# Altium PCB Electrode_PCB_v2.1.PcbDoc
Units mil, origin at the board's own origin, x right, y up, seen from the top; angles counter-clockwise.
Board outline 510.49 x 1258.83 mil, 2 copper layers (Top Layer, Bottom Layer), stack 34 mil thick; 34 components, 24 nets, 94 pads, 31 vias.
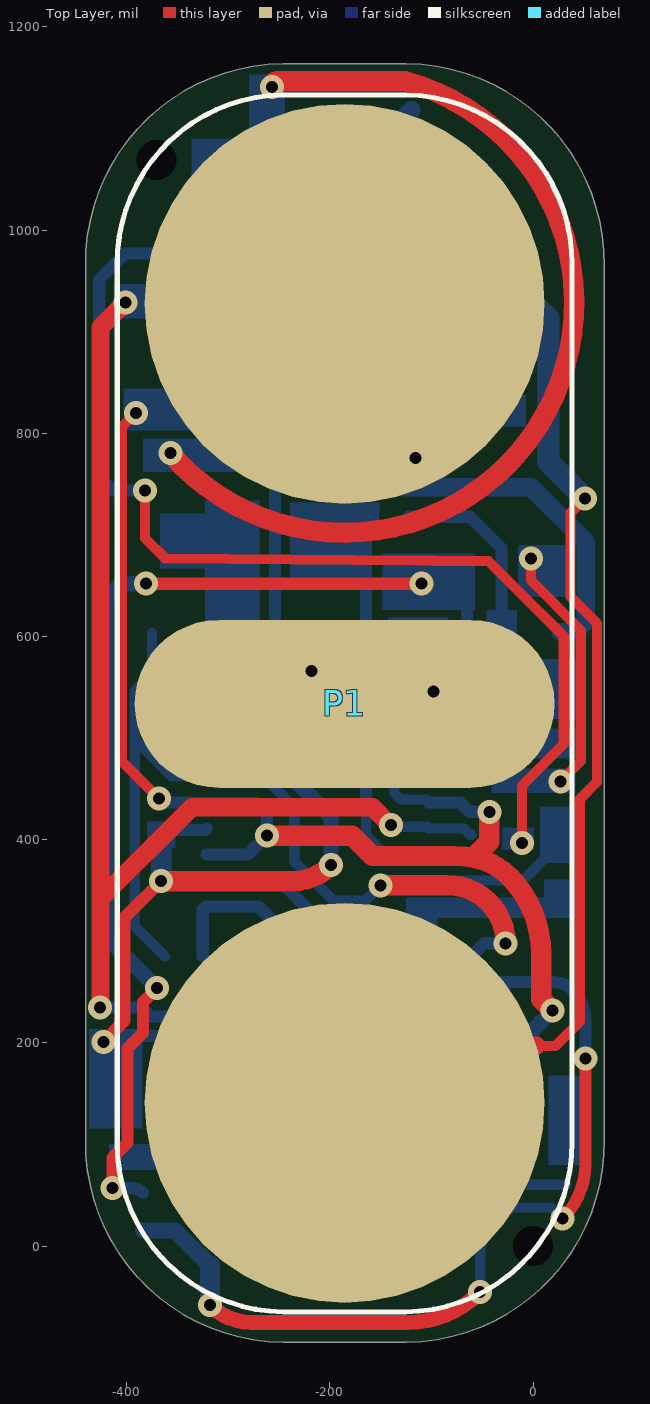
[diagram p0: Top Layer view]
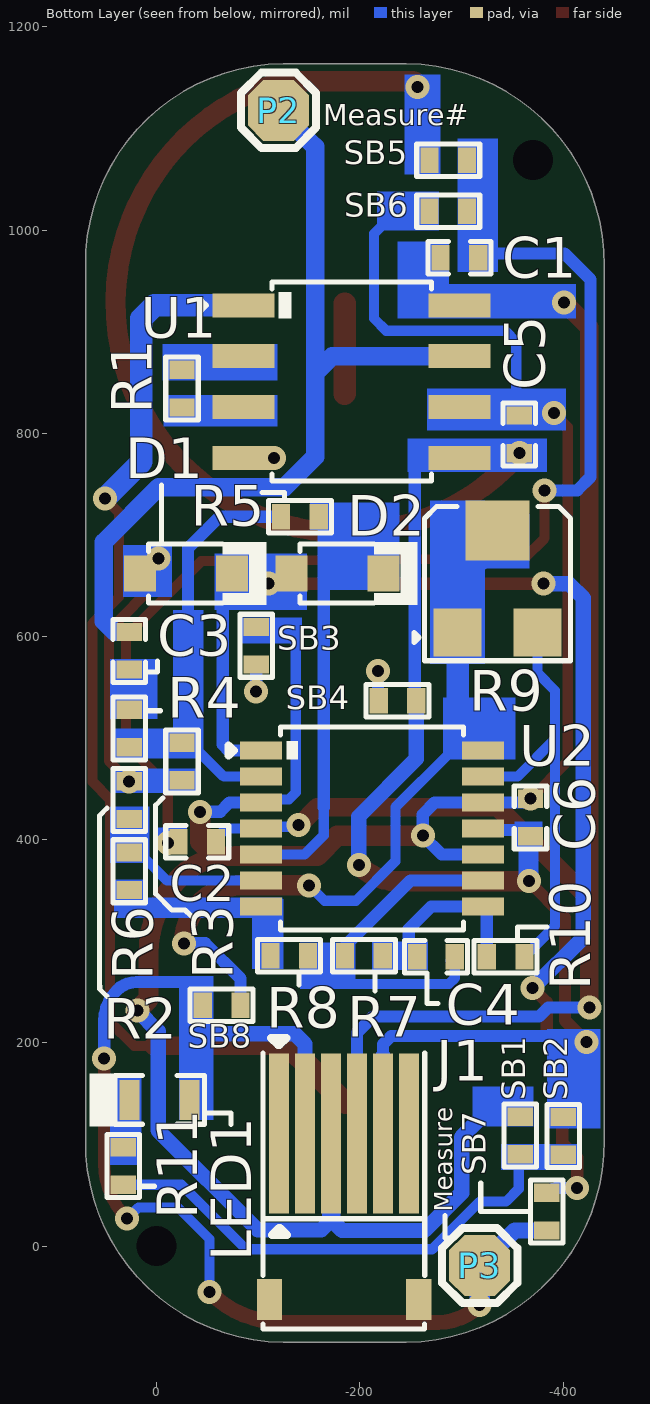
[diagram p1: Bottom Layer view, seen from below]
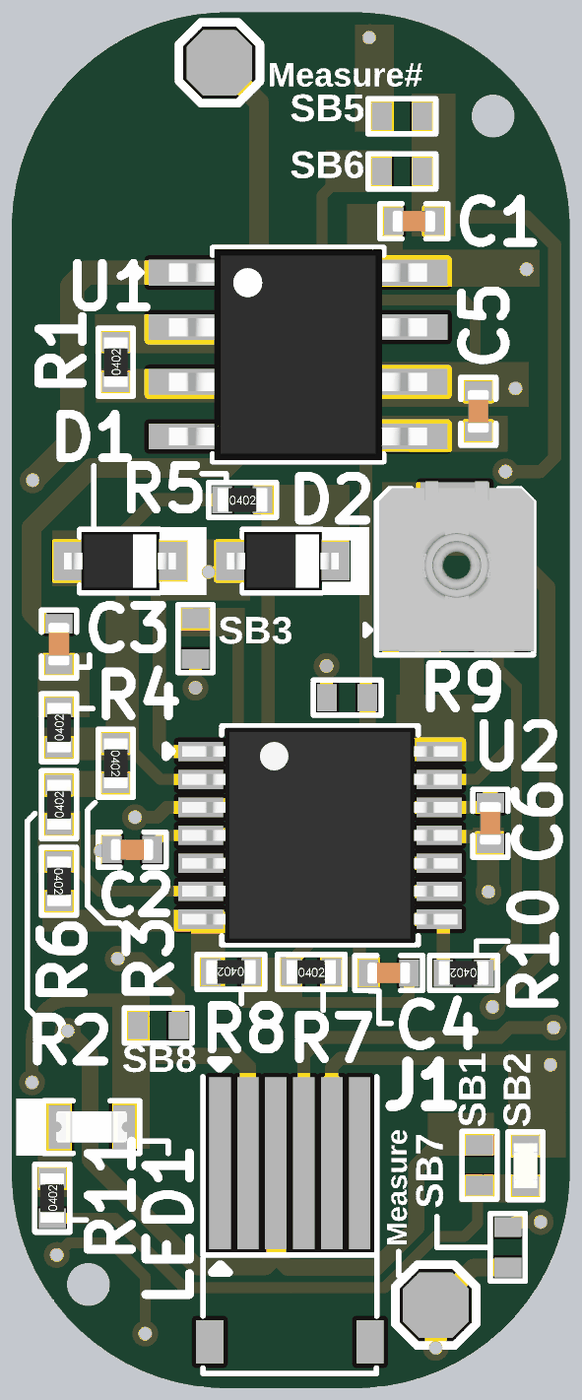
[diagram p2: 3D render of the assembled board from below, using the file's embedded part models]

## Layer stack, top to bottom
Top Solder: solder mask 3, Solder Resist, Dk 3.5
Top Layer: signal copper 9
Dielectric 1: dielectric 16, FR-4, Dk 4.8
Bottom Layer: signal copper 9
Bottom Solder: solder mask 3, Solder Resist, Dk 3.5

## Board outline
-440.49,104.27 ccw(c-243.65,102.06) -245.86,-94.78 -124.63,-94.78 ccw(c-126.84,102.06) 70,104.27 70,965 ccw(c-126.84,967.21) -124.63,1164.05 -245.86,1164.05 ccw(c-243.65,967.21) -440.49,965

## Design rules (kind name [scope] priority, off if disabled: settings)
Clearance [All] p1: gap=6 ignorepadtopadclearanceinfootprint=FALSE except(4: Arc-SMDPad Track-SMDPad SMDPad-SMDPad)
HoleSize [All] p1: absolutevalues=TRUE maxlimit=1000 minlimit=1 maxpercent=80.000 minpercent=20.000
HoleToHoleClearance [All] p1: gap=0 allowstackedmicrovias=TRUE
MinimumSolderMaskSliver [All] p1: minsoldermaskwidth=0
PolygonConnect [All] p1: connectstyle=Relief reliefconductorwidth=10 reliefentries=4 polygonreliefangle="90 Angle" airgapwidth=10
RoutingVias [All] p1: holewidth=11.81 width=23.62 viastyle="Through Hole" minholewidth=11.81 minwidth=23.62 maxholewidth=31.5 maxwidth=62.99
SilkToSilkClearance [All] p1: silktosilkclearance=0
SilkToSolderMaskClearance [IsPad] p1: minsilkscreentomaskgap=0 clearancetoexposedcopper=TRUE
SolderMaskExpansion [All] p1: expansion=4 istentingtop=FALSE
Width [All] p1: maxlimit=40 minlimit=10 preferedwidth=22
25 further rules are at their usual default settings.

## Components (designator, comment, footprint, x,y, rotation, side; value= is the part's Value field where it differs from the comment)
C1 "1uF" Cap-0402 -298,973 r180 bottom
C2 "0.1uF" CAP-0402 -40,398 r0 bottom
C3 "10nF" CAP-0402 27.02,586 r270 bottom locked
C4 "1uF" CAP-0402 -274.98,285 r180 bottom locked
C5 "1uF" Cap-0402 -357,799 r90 bottom
C6 "0.1uF" CAP-0402 -368,422 r90 bottom
D1 "1N4148WS" SOD-323 -29,662 r0 bottom locked
D2 "1N4148WS" SOD-323 -178,662 r0 bottom
J1 "For Electrode Board" "6 Pin Pads 0.65mm Pitch" -131.41,95 r180 bottom locked
LED1 "Orange" LED-0603 -2.98,144 r0 bottom locked
P1 "sEMG sensor" SEMG-SENSOR -185.49,534.27 r0 top locked
P2 "TEST POINT" TEST-POINT -120,1118 r180 bottom locked
P3 "TEST POINT" TEST-POINT -318,-19 r180 bottom
R1 "240R" RES-0402 -25,844 r90 bottom locked
R2 "150K" RES-0402 27.02,439 r90 bottom locked
R3 "150K" RES-0402 -25,477 r270 bottom locked
R4 "150K" RES-0402 27.02,509.5 r90 bottom locked
R5 "150K" RES-0402 -141,718 r180 bottom locked
R6 "150K" RES-0402 27.02,369 r270 bottom locked
R7 "80.6K" Res0402 -203.98,286 r180 bottom locked
R8 "80.6K" Res0402 -130.48,286 r0 bottom locked
R9 "TC33X-2-104E" TC33X-2-104E_ -296.26,604 r180 bottom locked
R10 "1K" RES-0402 -343.5,285 r0 bottom
R11 "1K" RES-0402 33,79 r90 bottom locked
SB1 "Solder Bridge 0402" "Solder Bridge 0402" -358,109 r270 bottom
SB2 "Solder Bridge 0402" "Solder Bridge 0402" -400.22,108.63 r270 bottom locked
SB3 "Solder Bridge 0402" "Solder Bridge 0402" -98,591 r90 bottom
SB4 "Solder Bridge 0402" "Solder Bridge 0402" -237,537 r180 bottom
SB5 "Solder Bridge 0402" "Solder Bridge 0402" -287,1069 r0 bottom
SB6 "Solder Bridge 0402" "Solder Bridge 0402" -287,1018.5 r0 bottom
SB7 "Solder Bridge 0402" "Solder Bridge 0402" -384,34 r270 bottom
SB8 "Solder Bridge 0402" "Solder Bridge 0402" -64,237 r0 bottom
U1 "AD8221ARZ-R7" SOIC-8 -191.98,851 r180 bottom locked
U2 "TL084CPWR" 14-TSSOP -211.98,411 r180 bottom locked

## Footprints (in the part's own frame and the unit in brackets; to place one, negate y for a bottom-side part, rotate by r counter-clockwise, add the part's x,y. Pads: shape width x height; smd on the part's side, far side on the other; paste and mask are expansions set on the pad)
"6 Pin Pads 0.65mm Pitch" [mm]
  rect 0.5x4 smd: 1(-0.279,0.406) 2(0.371,0.406) 3(1.021,0.406) 4(1.671,0.406) 5(2.321,0.406) 6(2.971,0.406)
  silkscreen extent -0.67,-2.13 3.37,2.79
14-TSSOP [mm]
  rect 1.05x0.45 smd: 1(-2.775,1.95) 2(-2.775,1.3) 3(-2.775,0.65) 4(-2.775,0) 5(-2.775,-0.65) 6(-2.775,-1.3) 7(-2.775,-1.95) 8(2.775,-1.95) 9(2.775,-1.3) 10(2.775,-0.65) 11(2.775,0) 12(2.775,0.65) 13(2.775,1.3) 14(2.775,1.95)
  silkscreen extent -3.58,-2.54 2.29,2.54, body extent -3.2,-2.5 3.2,2.5, height 1.2
Cap-0402 [mil]
  rect 18x25 smd mask+2.36: 1(-18.5,0) 2(18.5,0)
  silkscreen extent -31,-16 31,16, body extent -20,-10 20,10, height 19
CAP-0402 [mil]
  rect 18x25 smd mask+2.36: 1(-18.5,0) 2(18.5,0)
  silkscreen extent -31,-16 31,16, body extent -20,-10 20,10, height 19
LED-0603 [mm]
  rect 0.5x1 smd: 1(-0.75,0) 2(0.75,0)
  silkscreen extent -1.12,-0.66 1.75,0.66, body extent -0.82,-0.37 0.82,0.36, height 0.68
Res0402 [mil]
  rect 18x25 smd mask+4: 1(-18.5,0) 2(18.5,0)
  silkscreen extent -32,-17 32,16, body extent -23,-11 23,11, height 16
RES-0402 [mil]
  rect 18x25 smd mask+2.17: 1(-18.5,0) 2(18.5,0)
  silkscreen extent -32,-17 32,16, body extent -23,-11 23,11, height 16
SEMG-SENSOR [mm]
  round 10 smd: 1(0,9.987) 2(0,-9.987)
  oval 10.5x4.2 smd: 3(0,-0.013)
  silkscreen extent -5.68,-15.21 5.68,15.21
SOD-323 [mm]
  rect 0.8x0.9 smd mask+0.055: 1(-1.15,0) 2(1.15,0)
  silkscreen extent -2.01,-0.79 0.94,0.79, body extent -1.3,-0.67 1.3,0.67, height 1.1
SOIC-8 [mm]
  rect 1.55x0.6 smd: 1(-2.7,1.905) 2(-2.7,0.635) 3(-2.7,-0.635) 4(-2.7,-1.905) 5(2.7,-1.905) 6(2.7,-0.635) 7(2.7,0.635) 8(2.7,1.905)
  silkscreen extent -3.76,-2.49 1.99,2.49, body extent -3,-2.45 3,2.45, height 1.7
"Solder Bridge 0402" [mil]
  rect 18x25 smd mask+2.17: 1(-18.5,0) 2(18.5,0)
  silkscreen extent -32,-17 32,16
TC33X-2-104E_ [mm]
  rect 1.2x1.2 smd: 1(0,0) 3(2,0)
  rect 1.6x1.5 smd: 2(1,2.55)
  silkscreen extent -1.09,-0.71 2.83,3.15, body extent -0.76,-0.64 2.84,3.32, height 1.13
TEST-POINT [mil]
  oct 60x60 smd: 1(0,0)
  silkscreen extent -37,-37 37,37

## Part data
C1 C4 C5: library part CC0402KRX5R7BB105, "CAP CER 1UF 16V X5R 0402", Case Code (Imperial)=0402, Case Code (Metric)=1005, Dielectric=X5R, LCSC Part Number=C325464, Manufacturer=Yageo, Max Operating Temperature=85°C, Min Operating Temperature=-55°C, Supplier Part Number 1=311-1691-6-ND, Tolerance=10%, Voltage Rating=16V, Capacitance=1uF, Case/Package=0402, ComponentLink1Description=http://www.yageo.com/documents/recent/UPY-GPHC_X5R_4V-to-50V_12.pdf?src-supplier=Avnet+Europe, ComponentLink1URL=http://www.yageo.com/documents/recent/UPY-GPHC_X5R_4V-to-50V_12.pdf?src-supplier=Avnet+Europe, Composition=Ceramic, Depth=0.5mm, Halogen Free="Halogen Free", Height=0.5mm, Item Type=Capacitor, Lead Free="Lead Free", Length=1mm, Manufacturer Part Number=CC0402KRX5R7BB105, Mount="Surface Mount", Packaging="Tape and Reel", Pricing 1="1=0.36, 10=0.252, 100=0.1512, 500=0.1134, 1000=0.09576, 2500=0.09072, 5000=0.08568 (USD)", Radiation Hardening=No, Stock 1=1405667, Supplier 1=Digi-Key, Termination=SMD/SMT, Thickness=0.022inch, Voltage Rating (DC)=16V, Weight=2.3E-05oz, Width=0.02inch
C2 C6: library part GRM155R71H104ME14D, "CAP CER 0.1UF 50V X7R 0402", Capacitance=100nF, Case/Package=0402, LCSC Part Number=C182412, Manufacturer=Murata, Max Operating Temperature=125°C, Min Operating Temperature=-55°C, Tolerance=20%, Voltage Rating=50V, Category="Ceramic Capacitors", ComponentLink1Description=http://www.mouser.com/ds/2/281/c02e-2905.pdf?src-supplier=Mouser, ComponentLink1URL=http://www.mouser.com/ds/2/281/c02e-2905.pdf?src-supplier=Mouser, ComponentLink2Description=http://search.murata.co.jp/Ceramy/image/img/A01X/G101/ENG/GRM155R71H104ME14-01.pdf?src-supplier=Digi-Key, ComponentLink2URL=http://search.murata.co.jp/Ceramy/image/img/A01X/G101/ENG/GRM155R71H104ME14-01.pdf?src-supplier=Digi-Key, ComponentLink3Description=http://psearch.en.murata.com/capacitor/product/GRM155R71H104ME14%23.pdf?src-supplier=Avnet, ComponentLink3URL=http://psearch.en.murata.com/capacitor/product/GRM155R71H104ME14%23.pdf?src-supplier=Avnet, Item Type=Capacitor, Length=0.039inch, Manufacturer Part Number=GRM155R71H104ME14D, Mount="Surface Mount", Packaging="Cut Tape", Pricing 1="10000=0.00444, 20000=0.00420, 40000=0.00396, 60000=0.00372, 80000=0.00348, 100000=0.00324, 1000000=0.00300 (USD)", RoHS=Yes, RoHS Compliant=Yes, Stock 1=100000, Supplier 1=Avnet, Supplier Part Number 1=GRM155R71H104ME14D, Thickness=0.022inch, Width=0.02inch
C3: library part CC0402KRX7R9BB103, "CAP CER 10000PF 50V X7R 0402", Case Code (Imperial)=0402, Case Code (Metric)=1005, Dielectric=X7R, LCSC Part Number=C60133, Manufacturer=Yageo, Max Operating Temperature=125°C, Min Operating Temperature=-55°C, Package Quantity=1, Resistor Type=Ceramic, Tolerance=10%, Voltage=50V, Capacitance=10nF, Case/Package=0402, Category="Ceramic Capacitors", ComponentLink1Description=https://datasheet.ciiva.com/11788/0900766b8079c870-11788375.pdf?src-supplier=RSComponents, ComponentLink1URL=https://datasheet.ciiva.com/11788/0900766b8079c870-11788375.pdf?src-supplier=RSComponents, ComponentLink2Description=https://datasheet.ciiva.com/26862/getdatasheetpartid-138248-26862642.pdf?src-supplier=Verical, ComponentLink2URL=https://datasheet.ciiva.com/26862/getdatasheetpartid-138248-26862642.pdf?src-supplier=Verical, ComponentLink3Description=https://datasheet.ciiva.com/7978/1489800-7978093.pdf?src-supplier=Element14, ComponentLink3URL=https://datasheet.ciiva.com/7978/1489800-7978093.pdf?src-supplier=Element14, ComponentLink4Description=https://datasheet.ciiva.com/28450/1489800-28450377.pdf?src-supplier=Element14, ComponentLink4URL=https://datasheet.ciiva.com/28450/1489800-28450377.pdf?src-supplier=Element14, ComponentLink5Description=https://datasheet.ciiva.com/176/mlccorderingcode-176349.pdf?src-supplier=Digi-Key, ComponentLink5URL=https://datasheet.ciiva.com/176/mlccorderingcode-176349.pdf?src-supplier=Digi-Key, ComponentLink6Description=https://datasheet.ciiva.com/176/mlccorderingcode-176348.pdf?src-supplier=Digi-Key, ComponentLink6URL=https://datasheet.ciiva.com/176/mlccorderingcode-176348.pdf?src-supplier=Digi-Key, ComponentLink7Description=https://datasheet.ciiva.com/176/mlccorderingcode-176350.pdf?src-supplier=Digi-Key, ComponentLink7URL=https://datasheet.ciiva.com/176/mlccorderingcode-176350.pdf?src-supplier=Digi-Key, Depth=0.5mm, Halogen Free="Halogen Free", Height=0.5mm, Item Type=Capacitor, Lead Free="Lead Free", Length=1mm, Manufacturer Part Number=CC0402KRX7R9BB103, Mount="Surface Mount", Packaging="Tape and Reel", Pricing 1="10000=0.00178 (USD)", Radiation Hardening=No, Reach SVHC Compliant=Yes, RoHS=Yes, RoHS Compliant=Yes, Series=CC, Stock 1=995000, Supplier 1=Avnet, Supplier Part Number 1=CC0402KRX7R9BB103, Termination=SMD/SMT, Thickness=0.022inch, Voltage Rating=50V, Voltage Rating (DC)=50V, Width=0.02inch
D1 D2: "100V -55℃~+150℃@(Tj) 400mW Single 1.25V@150mA 4ns 1μA@75V 200mA SOD-323 Switching Diode ROHS", Manufacturer=YFW, ComponentLink1Description=LCSC, ComponentLink1URL=https://lcsc.com/product-detail/Switching-Diode_YFW-1N4148WS_C1884546.html, Manufacturer Part Number=1N4148WS
J1: library part "6 Pin Pads 0.65mm Pitch", "Ribbon wire Connection Pads 0.65mm Pitch"
LED1: library part 19-217/S2C-AQ1R1B/3T, "0603(H=0.4mm) λD=600.5~612.5nm VR=5V VF=1.7V~2.2V IF=25mA PD=60mW", LCSC Part Number=C146215, Manufacturer=Everlight, Supplier Part Number 1=1080-19-217/S2C-AQ1R1B/3TTR-ND, Category=LEDs, ComponentLink1Description=LCSC, ComponentLink1URL=https://www.lcsc.com/product-detail/Light-Emitting-Diodes-LED_Everlight-Elec-19-217-S2C-AQ1R1B-3T_C146215.html, Item Type=LED, Manufacturer Part Number=19-217/S2C-AQ1R1B/3T, RoHS=No, Supplier 1=Digi-Key
P1: library part "SEMG Sensor", "Sensor Connecting Pads"
P2 P3: "Test Point ON", Item Type="TEST POINT"
R1: library part RC0402FR-07240RL, "RES 240 OHM 1% 1/16W 0402", Case Code (Imperial)=0402, Case Code (Metric)=1005, Manufacturer=Yageo, Max Operating Temperature=155°C, Max Power Dissipation=63mW, Min Operating Temperature=-55°C, Package Quantity=1, Resistance Tolerance=1%, Resistor Type="Thick Film", Supplier Part Number 1=603-RC0402FR-07240RL, Temperature Coefficient=100ppm/°C, Voltage Rating=50V, Case/Package=0402, Category="Chip SMD Resistors", ComponentLink1Description=https://datasheet.ciiva.com/7849/1018594-7849915.pdf?src-supplier=Element14, ComponentLink1URL=https://datasheet.ciiva.com/7849/1018594-7849915.pdf?src-supplier=Element14, ComponentLink2Description=https://datasheet.ciiva.com/7849/1018594-7849916.pdf?src-supplier=Element14, ComponentLink2URL=https://datasheet.ciiva.com/7849/1018594-7849916.pdf?src-supplier=Element14, ComponentLink3Description=https://datasheet.ciiva.com/2519/pyu-r-int-thick-7-2519157.pdf?src-supplier=Digi-Key, ComponentLink3URL=https://datasheet.ciiva.com/2519/pyu-r-int-thick-7-2519157.pdf?src-supplier=Digi-Key, ComponentLink4Description=https://datasheet.ciiva.com/2519/pyu-r-int-thick-7-2519158.pdf?src-supplier=Digi-Key, ComponentLink4URL=https://datasheet.ciiva.com/2519/pyu-r-int-thick-7-2519158.pdf?src-supplier=Digi-Key, ComponentLink5Description=https://datasheet.ciiva.com/2519/pyu-r-int-thick-7-2519156.pdf?src-supplier=Digi-Key, ComponentLink5URL=https://datasheet.ciiva.com/2519/pyu-r-int-thick-7-2519156.pdf?src-supplier=Digi-Key, ComponentLink6Description=https://datasheet.ciiva.com/12669/pyu-rc0402-51-rohs-l-6-r-12669689.pdf?src-supplier=Mouser, ComponentLink6URL=https://datasheet.ciiva.com/12669/pyu-rc0402-51-rohs-l-6-r-12669689.pdf?src-supplier=Mouser, ComponentLink7Description=https://datasheet.ciiva.com/17419/pyu-rc0402-51-rohs-l-6-r-17419482.pdf?src-supplier=Future+Electronics, ComponentLink7URL=https://datasheet.ciiva.com/17419/pyu-rc0402-51-rohs-l-6-r-17419482.pdf?src-supplier=Future+Electronics, Construction=Rectangular, Depth=0.5mm, Features="Moisture Resistant", Height=0.016inch, Lead Free="Lead Free", Length=1mm, Manufacturer Part Number=RC0402FR-07240RL, Military Standard=Not, Number of Terminations=2, Packaging="Tape and Reel", Power Rating=63mW, Pricing 1="1=0.10000, 10=0.01200, 50=0.01200, 100=0.00500, 1000=0.00300, 10000=0.00100 (USD)", REACH SVHC=Unknown, Resistance=240R, RoHS=Yes, RoHS Compliant=Yes, Series=RC, Size Code=0402, Stock 1=1903202, Supplier 1=Mouser, Termination=SMD/SMT, Tolerance=1%, Voltage Rating (DC)=50V, Width=0.02inch
R2 R3 R4 R5 R6: library part RC0402JR-07150KL, "RES SMD 0402 150kOhm 5% Paper T/R", Case Code (Imperial)=0402, Case Code (Metric)=1005, LCSC Part Number=C137919, Manufacturer=Yageo, Max Operating Temperature=155°C, Max Power Dissipation=63mW, Min Operating Temperature=-55°C, Package Quantity=1, Resistance=150kR, Resistance Tolerance=5%, Resistor Type="Thick Film", Temperature Coefficient=100ppm/°C, Voltage Rating=50V, Case/Package=0402, Category="Chip SMD Resistors", ComponentLink1Description=https://datasheet.ciiva.com/7983/1018594-7983551.pdf?src-supplier=Element14, ComponentLink1URL=https://datasheet.ciiva.com/7983/1018594-7983551.pdf?src-supplier=Element14, ComponentLink2Description=https://datasheet.ciiva.com/2518/pyu-r-int-thick-7-2518929.pdf?src-supplier=Digi-Key, ComponentLink2URL=https://datasheet.ciiva.com/2518/pyu-r-int-thick-7-2518929.pdf?src-supplier=Digi-Key, ComponentLink3Description=https://datasheet.ciiva.com/2518/pyu-r-int-thick-7-2518930.pdf?src-supplier=Digi-Key, ComponentLink3URL=https://datasheet.ciiva.com/2518/pyu-r-int-thick-7-2518930.pdf?src-supplier=Digi-Key, ComponentLink4Description=https://datasheet.ciiva.com/2518/pyu-r-int-thick-7-2518928.pdf?src-supplier=Digi-Key, ComponentLink4URL=https://datasheet.ciiva.com/2518/pyu-r-int-thick-7-2518928.pdf?src-supplier=Digi-Key, ComponentLink5Description=https://datasheet.ciiva.com/7850/1018594-7850149.pdf?src-supplier=Element14, ComponentLink5URL=https://datasheet.ciiva.com/7850/1018594-7850149.pdf?src-supplier=Element14, ComponentLink6Description=https://datasheet.ciiva.com/17072/pyu-rc0402-51-rohs-l-6-r-17072379.pdf?src-supplier=Future+Electronics, ComponentLink6URL=https://datasheet.ciiva.com/17072/pyu-rc0402-51-rohs-l-6-r-17072379.pdf?src-supplier=Future+Electronics, ComponentLink7Description=https://datasheet.ciiva.com/15189/getdatasheetpartid-251830-15189543.pdf?src-supplier=Verical, ComponentLink7URL=https://datasheet.ciiva.com/15189/getdatasheetpartid-251830-15189543.pdf?src-supplier=Verical, Construction=Rectangular, Depth=0.5mm, Features="Moisture Resistant", Height=0.016inch, Item Type=Resistor, Lead Free="Lead Free", Length=1mm, Manufacturer Part Number=RC0402JR-07150KL, Military Standard=Not, Number of Terminations=2, Packaging="Tape and Reel", Power Rating=63mW, Pricing 1="10000=0.00100 (USD)", REACH SVHC="No SVHC", RoHS=Yes, RoHS Compliant=Yes, Series=RC, Size Code=0402, Stock 1=170000, Supplier 1="Arrow Electronics", Supplier Part Number 1=RC0402JR-07150KL, Termination=SMD/SMT, Tolerance=5%, Weight=2.3E-05oz, Width=0.02inch
R7 R8: library part RC-02W8062FT, "1/16W 50V ±1% ±200ppm/℃ -55℃~+155℃ 80.6kΩ 0402 Chip Resistor - Surface Mount ROHS", Manufacturer=FH, Manufacture Part Number=RC-02W8062FT
R9: "TRIMMER 100K OHM 0.1W J LEAD TOP", Color=Silver, LCSC Part Number=C719186, Manufacturer=Bourns, Max Operating Temperature=100°C, Max Power Dissipation=100mW, Min Operating Temperature=-40°C, Package Quantity=2500, Resistance=100kR, Resistance Tolerance=25%, Resistor Type=Carbon,Cermet, Temperature Coefficient=250ppm/°C, Voltage Rating (DC)=50V, Category="Variable Resistors and Potentiometers", ComponentLink1Description=https://datasheet.ciiva.com/11832/0900766b802749b3-11832506.pdf?src-supplier=RSComponents, ComponentLink1URL=https://datasheet.ciiva.com/11832/0900766b802749b3-11832506.pdf?src-supplier=RSComponents, ComponentLink2Description=https://datasheet.ciiva.com/8700/tc33-8700395.pdf?src-supplier=Avnet, ComponentLink2URL=https://datasheet.ciiva.com/8700/tc33-8700395.pdf?src-supplier=Avnet, ComponentLink3Description=https://datasheet.ciiva.com/2155/tc33-2155965.pdf?src-supplier=Digi-Key, ComponentLink3URL=https://datasheet.ciiva.com/2155/tc33-2155965.pdf?src-supplier=Digi-Key, ComponentLink4Description=https://datasheet.ciiva.com/7953/1818686-7953181.pdf?src-supplier=Element14, ComponentLink4URL=https://datasheet.ciiva.com/7953/1818686-7953181.pdf?src-supplier=Element14, ComponentLink5Description=https://datasheet.ciiva.com/16716/70155234-16716301.pdf?src-supplier=Allied+Electronics, ComponentLink5URL=https://datasheet.ciiva.com/16716/70155234-16716301.pdf?src-supplier=Allied+Electronics, ComponentLink6Description=https://datasheet.ciiva.com/2155/tc33-2155966.pdf?src-supplier=Digi-Key, ComponentLink6URL=https://datasheet.ciiva.com/2155/tc33-2155966.pdf?src-supplier=Digi-Key, ComponentLink7Description=https://datasheet.ciiva.com/7953/1818686-7953182.pdf?src-supplier=Element14, ComponentLink7URL=https://datasheet.ciiva.com/7953/1818686-7953182.pdf?src-supplier=Element14, ComponentLink8Description=https://datasheet.ciiva.com/2155/tc33-2155967.pdf?src-supplier=Digi-Key, ComponentLink8URL=https://datasheet.ciiva.com/2155/tc33-2155967.pdf?src-supplier=Digi-Key, Depth=3.8mm, Height=0.047inch, Item Type=Trimmer, Length=3mm, Manufacturer Part Number=TC33X-2-104E, Military Standard=Not, Mount="Surface Mount", Number of Turns=1, Packaging="Tape and Reel", Power Rating=100mW, Pricing 1="2500=0.15500, 5000=0.13130 (USD)", Radiation Hardening=No, REACH SVHC="No SVHC", RoHS=Yes, RoHS Compliant=Yes, Series=TC33, Stock 1=12500, Supplier 1="Arrow Electronics", Supplier Part Number 1=TC33X-2-104E, Termination="Foot Print", Tolerance=25%, Weight=29.4mg, Width=0.118inch
R10 R11: library part RC0402JR-071KL, "RES 1K OHM 5% 1/16W 0402", Case Code (Imperial)=0402, Case Code (Metric)=1005, LCSC Part Number=C105637, Manufacturer=Yageo, Max Operating Temperature=155°C, Max Power Dissipation=63mW, Min Operating Temperature=-55°C, Package Quantity=1, Power Rating=62.5mW, Resistance=1kR, Resistance Tolerance=5%, Resistor Type="Thick Film", Supplier Part Number 1=311-1.0KJRCT-ND, Temperature Coefficient=100ppm/°C, Voltage Rating=50V, Case/Package=0402, Category="Chip SMD Resistors", ComponentLink1Description=https://datasheet.ciiva.com/7983/1018594-7983558.pdf?src-supplier=Element14, ComponentLink1URL=https://datasheet.ciiva.com/7983/1018594-7983558.pdf?src-supplier=Element14, ComponentLink2Description=https://datasheet.ciiva.com/2452/pyu-r-int-thick-7-2452756.pdf?src-supplier=Digi-Key, ComponentLink2URL=https://datasheet.ciiva.com/2452/pyu-r-int-thick-7-2452756.pdf?src-supplier=Digi-Key, ComponentLink3Description=https://datasheet.ciiva.com/2452/pyu-r-int-thick-7-2452757.pdf?src-supplier=Digi-Key, ComponentLink3URL=https://datasheet.ciiva.com/2452/pyu-r-int-thick-7-2452757.pdf?src-supplier=Digi-Key, ComponentLink4Description=https://datasheet.ciiva.com/2452/pyu-r-int-thick-7-2452755.pdf?src-supplier=Digi-Key, ComponentLink4URL=https://datasheet.ciiva.com/2452/pyu-r-int-thick-7-2452755.pdf?src-supplier=Digi-Key, ComponentLink5Description=https://datasheet.ciiva.com/7850/1018594-7850170.pdf?src-supplier=Element14, ComponentLink5URL=https://datasheet.ciiva.com/7850/1018594-7850170.pdf?src-supplier=Element14, ComponentLink6Description=https://datasheet.ciiva.com/7850/1018594-7850171.pdf?src-supplier=Element14, ComponentLink6URL=https://datasheet.ciiva.com/7850/1018594-7850171.pdf?src-supplier=Element14, ComponentLink7Description=https://datasheet.ciiva.com/17081/pyu-rc0402-51-rohs-l-6-r-17081438.pdf?src-supplier=Future+Electronics, ComponentLink7URL=https://datasheet.ciiva.com/17081/pyu-rc0402-51-rohs-l-6-r-17081438.pdf?src-supplier=Future+Electronics, Construction=Rectangular, Depth=0.5mm, Features="Moisture Resistant", Height=0.016inch, Item Type=Resistor, Lead Free="Lead Free", Length=0.039inch, Manufacturer Part Number=RC0402JR-071KL, Military Standard=Not, Number of Terminations=2, Packaging="Tape and Reel", Pricing 1="1=0.10000, 10=0.01300, 100=0.00540, 1000=0.00244, 2500=0.00212, 5000=0.00175 (USD)", REACH SVHC="No SVHC", RoHS=Yes, RoHS Compliant=Yes, Series=RC, Size Code=0402, Stock 1=452315, Supplier 1=Digi-Key, Termination=SMD/SMT, Tolerance=5%, Width=0.02inch
SB1 SB2 SB3 SB4 SB5 SB6 SB7 SB8: "Solder Bridge ON"
U1: "IC OPAMP INSTR 825KHZ 8SOIC", Case/Package=SOIC, Input Bias Current=1.5nA, Input Offset Voltage (Vos)=60uV, Input Resistance=100GR, LCSC Part Number=C13342, Manufacturer="Analog Devices", Max Dual Supply Voltage=18V, Max Operating Temperature=85°C, Max Power Dissipation=200mW, Min Dual Supply Voltage=2.3V, Min Operating Temperature=-40°C, Nominal Supply Current=1mA, Operating Supply Voltage=36V, Output Current per Channel=18mA, Package Quantity=1000, Power Supply Rejection Ratio (PSRR)=130dB, Quiescent Current=900uA, Supplier Part Number 1=584-AD8221ARZ-R7, Voltage Gain=60dB, -3db Bandwidth=825kHz, Bandwidth=562kHz, Category="Amplifiers - Op Amps, Buffer, Instrumentation", Common Mode Rejection Ratio=80dB, ComponentLink1Description=https://datasheet.ciiva.com/15128/getdatasheetpartid-313520-15128733.pdf?src-supplier=Verical, ComponentLink1URL=https://datasheet.ciiva.com/15128/getdatasheetpartid-313520-15128733.pdf?src-supplier=Verical, ComponentLink2Description=https://datasheet.ciiva.com/2975/ad8221-2975658.pdf?src-supplier=Avnet, ComponentLink2URL=https://datasheet.ciiva.com/2975/ad8221-2975658.pdf?src-supplier=Avnet, ComponentLink3Description=https://datasheet.ciiva.com/2975/ad8221-2975980.pdf?src-supplier=Avnet, ComponentLink3URL=https://datasheet.ciiva.com/2975/ad8221-2975980.pdf?src-supplier=Avnet, ComponentLink4Description=https://datasheet.ciiva.com/6628/ad8221-6628618.pdf?src-supplier=Digi-Key, ComponentLink4URL=https://datasheet.ciiva.com/6628/ad8221-6628618.pdf?src-supplier=Digi-Key, ComponentLink5Description=https://datasheet.ciiva.com/6628/ad8221-6628619.pdf?src-supplier=Digi-Key, ComponentLink5URL=https://datasheet.ciiva.com/6628/ad8221-6628619.pdf?src-supplier=Digi-Key, ComponentLink6Description=https://datasheet.ciiva.com/6628/ad8221-6628617.pdf?src-supplier=Digi-Key, ComponentLink6URL=https://datasheet.ciiva.com/6628/ad8221-6628617.pdf?src-supplier=Digi-Key, ComponentLink7Description=https://datasheet.ciiva.com/48709/001249009-da-01-en-ic-amp-inst-prec-ad8221arz-r7-soic-8-adi-48709526.pdf?src-supplier=Conrad, ComponentLink7URL=https://datasheet.ciiva.com/48709/001249009-da-01-en-ic-amp-inst-prec-ad8221arz-r7-soic-8-adi-48709526.pdf?src-supplier=Conrad, Contact Plating=Tin,Matte, Item Type=IC, Lead Free="Contains Lead", Manufacturer Part Number=AD8221ARZ-R7, Number of Channels=1, Number of Circuits=1, Number of Elements=1, Number of Pins=8, Operating Supply Current=1mA, Packaging="Tape and Reel", Power Dissipation=200mW, Pricing 1="1=7.37000, 10=6.66000, 25=6.35000, 50=6.35000, 100=5.51000, 250=5.27000, 500=4.80000, 1000=4.37000, 10000=4.37000 (USD)", Radiation Hardening=No, RoHS=Yes, RoHS Compliant=Yes, Series=-, Slew Rate=2.5V/µs, Supplier 1=Mouser, Supply Current=1mA
U2: "IC OPAMP JFET 4 CIRCUIT 14TSSOP", Case/Package=TSSOP, Input Bias Current=400pA, Input Offset Voltage (Vos)=15mV, Manufacturer="Texas Instruments", Max Dual Supply Voltage=18V, Max Operating Temperature=125°C, Max Power Dissipation=680mW, Min Dual Supply Voltage=3.5V, Min Operating Temperature=-40°C, Min Supply Voltage=7V, Nominal Supply Current=11.2mA, Operating Supply Current=1.4mA, Package Quantity=1, Quiescent Current=2.8A, Supplier Part Number 1=595-TL084CPWR, Voltage Gain=106.02dB, Bandwidth=3MHz, Category="Amplifiers - Op Amps, Buffer, Instrumentation", Common Mode Rejection Ratio=70dB, ComponentLink1Description=https://datasheet.ciiva.com/34301/1064719-34301936.pdf?src-supplier=Jameco, ComponentLink1URL=https://datasheet.ciiva.com/34301/1064719-34301936.pdf?src-supplier=Jameco, ComponentLink2Description=https://datasheet.ciiva.com/1795/tl081a-1795644.pdf?src-supplier=Digi-Key, ComponentLink2URL=https://datasheet.ciiva.com/1795/tl081a-1795644.pdf?src-supplier=Digi-Key, ComponentLink3Description=https://datasheet.ciiva.com/1795/tl081a-1795643.pdf?src-supplier=Digi-Key, ComponentLink3URL=https://datasheet.ciiva.com/1795/tl081a-1795643.pdf?src-supplier=Digi-Key, ComponentLink4Description=https://datasheet.ciiva.com/1795/tl081a-1795645.pdf?src-supplier=Digi-Key, ComponentLink4URL=https://datasheet.ciiva.com/1795/tl081a-1795645.pdf?src-supplier=Digi-Key, ComponentLink5Description=https://datasheet.ciiva.com/14459/tl082-14459749.pdf?src-supplier=Avnet, ComponentLink5URL=https://datasheet.ciiva.com/14459/tl082-14459749.pdf?src-supplier=Avnet, ComponentLink6Description=https://datasheet.ciiva.com/48707/001072249-da-01-en-ic-opamp-jfet-3mh-tl084cpwr-tssop-14-tid-48707867.pdf?src-supplier=Conrad, ComponentLink6URL=https://datasheet.ciiva.com/48707/001072249-da-01-en-ic-opamp-jfet-3mh-tl084cpwr-tssop-14-tid-48707867.pdf?src-supplier=Conrad, Contact Plating=Gold, Gain Bandwidth Product=3MHz, Lead Free="Lead Free", Manufacturer Part Number=TL084CPWR, Max I/O Voltage=15mV, Max Supply Voltage=18V, Nominal Gain Bandwidth Product=3MHz, Number of Amplifiers=4, Number of Channels=4, Number of Circuits=4, Number of Elements=4, Number of Pins=14, Packaging="Tape and Reel", Pricing 1="1=0.64000, 10=0.54500, 50=0.54500, 100=0.37800, 500=0.32000, 1000=0.24700, 2000=0.22500, 10000=0.22500 (USD)", Radiation Hardening=No, REACH SVHC="No SVHC", RoHS=Yes, RoHS Compliant=Yes, Slew Rate=13V/µs, Stock 1=3, Supplier 1=Mouser, Unity Gain Bandwidth Product=3MHz

## Free pads (board coordinates)
  round 0 hole 39.37 unplated: MH1(-370.49,1069.27) MH2(0,0)
  rect 25x40 smd far side: ""(-257.89,-52.5) ""(-111.09,-52.5)

## Via types
v1: diameter 23.62, hole 11.81, Top Layer to Bottom Layer, tented both sides, 31 vias

## Nets (pads, with @x,y where several pads share a name; then routed paths per layer and width w, separated by ;. In a path a pad name is that pad's centre, name@x,y a point inside that pad or via, vN(x,y) a via of type N, cw(c..) or ccw(c..) an arc to the next point about the centre after c; other vN are vias at no path point)
#rg: R1.2 U1.2
*rg: R1.1 U1.3
-VCC_3V3: C5.1 C6.1 J1.5 SB2.1 SB4.2 SB5.2 U1.5 U2.11 | length 2237
  Top Layer w12: v1(-423,201) -402,222 -402,323.6 v1(-366.3,359.3)
  Top Layer w20: v1(-366.3,359.3) -236.89,359.3 ccw(c-236.89,412.91) v1(-198.98,375) ; v1(-357,780.5) ccw(c-185.84,928.53) -125.5,1146.62 -251.38,1146.62 ccw(c-251.38,1141) v1(-257,1141)
  Bottom Layer w10: -410.61,161.5 -410.61,170.61 -389.22,192 ; C6.1 -366,403.5 C6.1@-364.5,403.5
  Bottom Layer w12: v1@-420,207 -231,207 -222.77,198.77 J1.5@-222.77,184.73 ; C6.1@-366,405 -361.24,409.76 -322.48,409.76 U2.11 ; SB4.2@-253.98,542 -253.98,768
  Bottom Layer w15: SB4.2 -255.5,479.5 -198.98,422.98 v1(-198.98,375)
  Bottom Layer w18: J1.5 J1.5@-222.77,184.73
  Bottom Layer w20: -406.22,144.63 -400.22,138.63 ; v1@-366,359.6 -366,403.5 C6.1@-366,405
  Bottom Layer w22: v1(-423,201) v1@-421,203 ; -258,1083 -257.31,1083.69 ; v1@-257.31,1140.69 v1(-257,1141)
  Bottom Layer w25: -257.31,1083.69 v1@-257.31,1140.69
END: P1.1 U1.4 | length 118.9
  Top Layer w22: P1.1@-185.25,927.83 -185.25,839.27 P1.1@-184.98,839
  Bottom Layer w22: v1(-115.67,776) U1.4
GND: R11.1 SB1.2 SB2.2 | length 472.9
  Bottom Layer w10: SB1.2@-356.5,89 -356.5,56.5 -344,44 -318.16,44 -271.16,-3 -88,-3 -24.5,60.5 R11.1
IN2N: R2.1 R6.1 U2.6 | length 141.2
  Bottom Layer w10: U2.6 -10.18,359.82 12,382 17.5,387.5 R6.1
IN2P: D2.1 R5.2 U2.5 | length 397.8
  Bottom Layer w10: D2.1@-219.17,664 -211,655.83 D2.1@-211,659.92 ; -164.5,432 -164.5,404.52 -145.39,385.41 U2.5 U2.5@-101.74,385.41
  Bottom Layer w12: -164.5,432 R5.2@-164.5,716
Measure: J1.2 LED1.1 P3.1 SB7.2 SB8.2 | length 1046.2
  Top Layer w12: v1(29,27) ccw(c-25.64,81.64) 51.63,81.64 v1(51.63,184.9)
  Top Layer w15: v1(-318,-58) ccw(c-276.96,-16.96) -276.96,-75 -123.42,-75 ccw(c-123.42,25) -52.71,-45.71 v1(-52,-45)
  Bottom Layer w10: v1(-52,-45) -52,7 -21,38 18,38 v1(29,27) ; -45.5,211.5 SB8.2
  Bottom Layer w12: SB8.2 -45.5,251.55 cw(c-33.55,251.55) -42,260 19.69,260 cw(c19.69,232.69) 39,252 cw(c8.5,221.5) 51.63,221.5 v1(51.63,184.9)
  Bottom Layer w15: J1.2@-146,183 -146,199 -136,209 -48,209 -45.5,211.5 -39,218
  Bottom Layer w16: SB7.2 -352.5,15.5 P3.1
  Bottom Layer w20: v1(-318,-58) -318,-23.14 P3.1
Measure#: C3.1 P2.1 U1.7 | length 849.7
  Bottom Layer w18: U1.7 -173,876 -160,863 ; P2.1 -156,1082 -156,863 -156,777 -126,747 -2,747 52,693 52,615.04 41.46,604.5 C3.1
Measure*: R9.1 R9.2 SB8.1 U2.14 | length 692.7
  Top Layer w20: v1(-150,355.19) -86.49,355.19 cw(c-83.99,298.13) v1(-26.87,298.13)
  Bottom Layer w10: R9.2@-360.35,685 -336,685 -322,671 ; -318.98,509.5 -296.26,532.22 ; -312.98,654 -312.98,620.72 R9.1 ; -288,485 -235,432 -235,378.76 -196.24,340 -165.19,340 v1(-150,355.19)
  Bottom Layer w12: SB8.1 -82.5,263.5 -47.87,298.13 v1(-26.87,298.13)
  Bottom Layer w22: -296.26,532.22 R9.1
MID: P1.2 U1.1 | length 1101.3
  Top Layer w10: 3.19,197.19 22.19,197.19 46,221 46,440 63,457 63,613 37,639 37,722 v1(51,736)
  Top Layer w18: P1.2@-139.56,187 -129.37,197.19 3.19,197.19
  Top Layer w22: P1.2 P1.2@-139.56,187
  Bottom Layer w22: U1.1 2.11,926 15,913.11 15,772 v1(51,736)
NetC1_2: C1.2 C2.2 SB5.1 SB6.1 | length 1125.3
  Top Layer w10: v1(-381.87,743.91) -381.87,696.87 -361.96,676.96 -114.24,674.81 -114.16,674.81 -101.97,674.81 -99.02,674.68 -43.83,674.2 -18,648.37 30.2,600.17 30.2,494.2 -11,453 v1(-11,397)
  Bottom Layer w12: v1(-381.87,743.91) -413.91,743.91 -427,757 -427,951.38 -401.38,977 C1.2@-317,977
  Bottom Layer w25: C1.2@-317,977 -317,1018.5
NetC3_2: C3.2 R4.2
NetC4_2: C4.2 R7.1 R8.1 U2.9 | length 353.4
  Bottom Layer w10: C4.2@-289.48,281 C4.2 -293.48,263.86 -287.62,258 -178.98,258 ; R7.1@-188.98,289.5 R7.1 R7.1@-185.48,295.48 ; R7.1@-181.98,293 -174.98,286 R8.1@-152.98,286
  Bottom Layer w12: U2.9@-322.22,359.82 -249.82,359.82 R7.1@-185.48,295.48
NetD1_2: D1.2 R2.2 R3.2 | length 273.7
  Top Layer w10: v1(-2,677) -2,655.37 22.08,631.29 22.08,630.92 47,606 47,477.48 v1(27.02,457.5)
  Bottom Layer w10: v1(-2,677) 0.28,674.72 5.53,674.72 16.28,663.97 D1.2
NetLED1_2: LED1.2 R11.2
NetP1_3: P1.3 SB3.1 SB4.1 | length 53
  Bottom Layer w12: SB4.1@-218,539.5 v1(-218,566) ; v1(-98,546) SB3.1
NetR3_1: R3.1 R4.1 R5.1 U2.2 | length 366.6
  Bottom Layer w10: U2.2 U2.2@-101.74,462.18 ; U2.2@-101.65,462.09 U2.2@-101.74,462.18 ; R3.1@-26.92,501.44 -66.18,462.18 U2.2@-101.74,462.18
  Bottom Layer w12: R5.1 -61.98,718 -30.98,687 -30.98,517
NetR9_3: R9.3 R10.1 U2.13 | length 423.5
  Bottom Layer w10: R9.3 -375,563.98 -391.98,547 -391.98,498.98 ; R10.1 -383,306 -391.98,314.98 -391.98,498.98 ; U2.13@-322.22,462.18 -355.18,462.18 -391.98,498.98
OUT1: D1.1 D2.2 SB7.1 U2.1 | length 1189.4
  Top Layer w12: v1(-414,57.19) -414,87 -399.19,101.81 -399.19,194.81 -384,210 -384,240 v1(-370,254) ; v1(-381,652) v1(-110,652) v1@-109.76,652
  Bottom Layer w10: D1.1 D1.1@-65,652.72
  Bottom Layer w12: v1(-414,57.19) -395.32,57.19 cw(c-395.32,41.18) SB7.1@-384.02,52.52 ; v1@-113,649 -110,649 v1@-110,642 ; U2.1 -70.86,487.77 -65,493.63 D1.1@-65,652.72
  Bottom Layer w15: v1(-381,652) -406,652 -420,638 -420,304 v1(-370,254)
RECT: R6.2 R8.2 U2.7 | length 53.8
  Bottom Layer w10: R8.2 -111.98,328 -105.75,334.23 U2.7
SMOOTH: C4.1 R7.2 R10.2 U2.8 | length 152.7
  Bottom Layer w10: U2.8@-322.33,334.11 U2.8@-322.22,334.23
  Bottom Layer w12: R10.2 -325,331.44 U2.8@-322.33,334.11 ; U2.8@-322.22,334.23 U2.8 -270.23,334.23 -248.21,312.21 C4.1@-248.21,293
VCC_3V3: C1.1 C2.1 J1.4 U1.8 U2.4 | length 1458.4
  Top Layer w18: v1(-426,235) -425.68,235.32 -425.68,342.07 ; v1(-401.14,929.03) -425.68,904.49 -425.68,342.07 ; v1(-139.62,414.62) -140.6,414.62 -157.98,432 -335.76,432 -425.68,342.07
  Bottom Layer w10: v1(-401.14,929.03) v1@-399,929 ; v1(-139.62,414.62) -137.81,412.81 -104.54,412.81 U2.4 -68,411 -62,405 C2.1@-60.5,405
  Bottom Layer w12: v1(-426,235) -385.5,235 -376.5,226 -213,226 -197.18,210.18 J1.4
VREF_GND: C5.2 C6.2 J1.3 SB1.1 SB3.2 SB6.2 U1.6 U2.3 U2.10 U2.12 | length 2455.2
  Top Layer w10: v1(-391,820) -392.68,818.32 -404.68,806.32 -404.68,477.18 v1(-368,440.5)
  Top Layer w20: v1(-262,404) -261.81,403.81 -177.81,403.81 -158,384 -80.04,384 ; -77.84,384 cw(c-77.84,278.16) -57.28,381.98 cw(c-70.1,317.27) -23.45,363.92 cw(c-99.36,288) 8,288 8,243 v1(19,232) ; -56.86,384.14 -42.98,398.02 -42.98,427.28 v1(-42.67,427.59)
  Bottom Layer w10: C5.2@-358.48,809 -353.98,813.5 C5.2@-353.98,817.5 ; C5.2 -357,820.56 C5.2@-357,821.79 ; C5.2@-353.98,821.79 -353.98,823.5 -353.98,890 -342.98,901 -226,901 -214,913 -214,996.5 -236.25,1018.75 -247.5,1018.75 ; U2.3@-101.74,436.59 -104.96,439.81 -130.25,439.81 -137,446.56 -137,599.64 -131.14,605.5 -102,605.5 SB3.2
  Bottom Layer w12: v1(-368,440.5) -364.5,440.5 -360.59,436.59 U2.12 -273.59,436.59 -262,425 v1(-262,404) -280.59,385.41 U2.10 ; U2.3 -101.74,436.59 -71.59,436.59 -62.59,427.59 v1(-42.67,427.59)
  Bottom Layer w15: -343,139 -332,139 -300.28,107.28 -300.28,52.28 -263.5,15.5 -182.5,15.5 -172,26 -162,16 -99.5,16 -1.5,114 -1.5,211.5 v1(19,232)
  Bottom Layer w18: -172,26 J1.3@-172,110.59
  Bottom Layer w20: v1(-391,820) -390.44,820.56 -357,820.56 -356.92,820.56 -353.98,823.5 U1.6@-325,823.5
pads on no net: J1.1 J1.6

## Other copper
Bottom Layer:
  rectangle net #rg: -118.98,852 -6,888
  rectangle net NetC1_2: -30,390 1,412
  region net -VCC_3V3: -244,1055 -244,1153 -279.63,1153 -279.63,1055
  rectangle net VREF_GND: -143,593 -83,619
  rectangle net VREF_GND: -371.02,118 -311,157
  rectangle net RECT: -124.89,273 -93.89,341.61
  rectangle net Measure: -56,124 -22,266
  rectangle net NetC1_2: -336,959 -296,1090
  rectangle net NetD1_2: -41,446 42,470
  rectangle net -VCC_3V3: -384,762 -247,795
  rectangle net -VCC_3V3: -380,392 -352,418
  rectangle net Measure*: -353,479 -282,540
  rectangle net VREF_GND: -278,999.5 -217,1038
  rectangle net -VCC_3V3: -437,116 -384.22,214
  rectangle net VREF_GND: -403,803 -266,844
  rectangle net Measure*: -323,573 -269,734
  rectangle net VCC_3V3: -413,913 -237,947
  rectangle net NetD1_2: -15,639 33,690
  rectangle net OUT1: -148,626 -57,682
  rectangle net IN2P: -239,705 -151,732
  rectangle net NetR3_1: -45.98,480 43.02,509.5
  rectangle net SMOOTH: -266.98,272 -211.98,300
  rectangle net NetC4_2: -195.98,253 -141,299
  rectangle net NetR3_1: -45.98,480 -15.98,626
  rectangle net RECT: -124,323 42,343
  region net VCC_3V3: -237,931 -237,989 -288,989 -288,931
  rectangle net NetC3_2: -0.98,519 46.02,539
  rectangle net GND: -417.22,75 -339,100.63
  rectangle net NetLED1_2: 15.02,80 46.02,168
  rectangle net IN2N: 7,377 46.02,433
  rectangle net NetC3_2: -0.98,519 46.02,578
  rectangle net *rg: -118.98,807 -7,838
  rectangle net RECT: 11,323 42,361
  rectangle net Measure*: -367,667 -304,721
  rectangle net IN2P: -239,646 -159,732

## Silkscreen, mask and mechanical layers (free items; w line width, h text height)
Bottom Overlay:
  lines w5: -384,314 -355,314 -355,302 ; -367,34 -319,34 -319,62 ; -291,8 -284,8 -284,30 ; -277,239 -266,239 -266,268.53 -253.98,269 ; -266,269 -263.98,269 ; -263.94,-28.85 -263.94,33 ; -263.69,-76.5 -263.69,-81.5 -104.83,-81.5 -104.83,-76.5 ; -215,251 -215,268 ; -140,257 -140,269 ; -126,735 -126,742 -104,742 ; -104.83,-28.75 -104.83,27 ; -73,120 -73,131 -47,131 ; -34,325 -28,331 -14.98,331 0.93,346.91 0.93,434.07 -6.07,441.07 ; -5,692 -5,749 ; -4,527 11,527 ; -1,576 -1,565 11.02,565 ; 2,59 14,59 ; 49,246 56,253 56.02,261 56.02,424 49.02,431
  text "Measure#" at -164,1096.39 h35
  text "Measure" at -297,34 h30 r270
Board Outline:
  lines w5: -272.49,-92.67 -272.26,-92.44
  lines w10: -440.49,104.27 ccw(c-243.65,102.06) -245.86,-94.78 -124.63,-94.78 ccw(c-126.84,102.06) 70,104.27 70,965 ccw(c-126.84,967.21) -124.63,1164.05 -245.86,1164.05 ccw(c-243.65,967.21) -440.49,965 ; -440.49,104.27 -440.49,965 ; -440.49,104.27 -440.49,965
Fabrication:
  drawing of 191 lines, arcs and shapes, not listed
  text "Layer" at -1884.42,2686 h60
  text "Name" at -1474.51,2686 h60
  text "Material" at -544.77,2686 h60
  text "Thickness" at 315,2686 h60
  text "Constant" at 964.84,2686 h60
  text "Board Layer Stack" at 1534.7,2686 h60
  text "Top Overlay" at -1474.51,2566 h60
  text "Top Solder" at -1474.51,2446 h60
  text "Solder Resist" at -544.77,2446 h60
  text "0.076mm" at 315,2446 h60
  text "3.5" at 964.84,2446 h60
  text "1" at -1884.42,2326 h60
  text "Top Layer" at -1474.51,2326 h60
  text "0.229mm" at 315,2326 h60
  text "Dielectric 1" at -1474.51,2206 h60
  text "FR-4" at -544.77,2206 h60
  text "0.406mm" at 315,2206 h60
  text "4.8" at 964.84,2206 h60
  text "2" at -1884.42,2086 h60
  text "Bottom Layer" at -1474.51,2086 h60
  text "0.229mm" at 315,2086 h60
  text "Bottom Solder" at -1474.51,1966 h60
  text "Solder Resist" at -544.77,1966 h60
  text "0.076mm" at 315,1966 h60
  text "3.5" at 964.84,1966 h60
  text "Bottom Overlay" at -1474.51,1846 h60
  text "Total board thickness:" at -1884.42,1726 h60
  text "1.016mm" at 315,1726 h60
Drill Drawing:
  lines w10: -3542.71,3025.5 -3476.04,3025.5 -3476.04,3092.17 -3542.71,3092.17 -3542.71,3025.5 ; -3542.71,3192.17 -3526.04,3192.17 -3509.38,3175.5 -3492.71,3192.17 -3476.04,3192.17 -3492.71,3208.83 -3476.04,3225.5 -3492.71,3225.5 -3509.38,3242.17 -3526.04,3225.5 -3542.71,3225.5 -3526.04,3208.83 -3542.71,3192.17
  lines w15: -3602.5,2980.5 9191.93,2980.5 ; -3602.5,3280.5 9191.93,3280.5 ; -3051.62,2830.5 -3051.62,3430.5 ; -2511.76,2830.5 -2511.76,3430.5 ; -1422.08,2830.5 -1422.08,3430.5 ; -916.2,2830.5 -916.2,3430.5 ; -182.4,2830.5 -182.4,3430.5 ; 1317.15,2830.5 1317.15,3430.5 ; 1907,2830.5 1907,3430.5 ; 2652.79,2830.5 2652.79,3430.5 ; 3402.59,2830.5 3402.59,3430.5 ; 4256.35,2830.5 4256.35,3430.5 ; 5589.96,2830.5 5589.96,3430.5 ; 6923.57,2830.5 6923.57,3430.5 ; 7789.33,2830.5 7789.33,3430.5 ; -3602.5,2830.5 9191.93,2830.5 9191.93,3430.5 -3602.5,3430.5 -3602.5,2830.5
  text "Symbol" at -3512.5,3325.5 h72
  text "Count" at -3006.62,3325.5 h72
  text "Hole Size" at -2466.76,3325.5 h72
  text "Plated" at -1377.08,3325.5 h72
  text "Hole Type" at -871.2,3325.5 h72
  text "Drill Layer Pair" at -137.4,3325.5 h72
  text "Via/Pad" at 1362.15,3325.5 h72
  text "Pad Shape" at 1952,3325.5 h72
  text "Template" at 2697.79,3325.5 h72
  text "Description" at 3447.59,3325.5 h72
  text "Hole Tolerance (+)" at 4301.35,3325.5 h72
  text "Hole Tolerance (-)" at 5634.96,3325.5 h72
  text "Hole Length" at 6968.57,3325.5 h72
  text "Routed Path Length" at 7834.33,3325.5 h72
  text "2" at -3006.62,3175.5 h60
  text "39.37mil (1.000mm)" at -2466.76,3175.5 h60
  text "NPTH" at -1377.08,3175.5 h60
  text "Round" at -871.2,3175.5 h60
  text "Top Layer - Bottom Layer" at -137.4,3175.5 h60
  text "Pad" at 1362.15,3175.5 h60
  text "Rounded" at 1952,3175.5 h60
  text "c0hn100" at 2697.79,3175.5 h60
  text "-" at 6968.57,3175.5 h60
  text "-" at 7834.33,3175.5 h60
  text "31" at -3006.62,3025.5 h60
  text "11.81mil (0.300mm)" at -2466.76,3025.5 h60
  text "PTH" at -1377.08,3025.5 h60
  text "Round" at -871.2,3025.5 h60
  text "Top Layer - Bottom Layer" at -137.4,3025.5 h60
  text "Via" at 1362.15,3025.5 h60
  text "Rounded" at 1952,3025.5 h60
  text "v60h30m0mx0" at 2697.79,3025.5 h60
  text "-" at 6968.57,3025.5 h60
  text "-" at 7834.33,3025.5 h60
  text "33 Total" at -3006.62,2875.5 h60

## Dimensions
70,965 to -440.49,965 on Dimension
-124.63,-94.78 to -245.86,1164.05 on Dimension
-126.84,102.06 to -126.84,102.06 on Dimension
-243.65,102.06 to -243.65,102.06 on Dimension
-126.84,967.21 to -126.84,967.21 on Dimension
-243.65,967.21 to -243.65,967.21 on Dimension
70,965 to 70,104.27 on Dimension
-440.49,965 to -440.49,104.27 on Dimension